# EAGLE board open_pair (EAGLE 9.6.2)

Size 30 x 20 mm. Coordinates in mm from the lower left corner, seen from the top.
Outline: 0,0 30,0 30,20 0,20 0,0
Copper layers used: 

## Footprints (pad centres in the part's own frame; a part is rotated, then mirrored left to right if it is on the bottom)
R0805 = smd 1 x 1.3: 1 -1,0; 2 1,0

## Placement (x,y rotation side)
R1  10k  [R0805]  6,8 0 top
R2  10k  [R0805]  24,8 0 top
R3  10k  [R0805]  6,12 0 top
R4  10k  [R0805]  24,12 0 top

## Library data of the parts
R1-R4 = guide

## Nets
D_N: R3.2 R4.1
D_P: R1.2 R2.1